# Altium PCB Smart-Switch-v1.0.PcbDoc (part 2 of 2)
Units mil, origin at the board's own origin, x right, y up, seen from the top; angles counter-clockwise.
Board outline 1456.69 x 1377.95 mil, 2 copper layers (Top Layer, Bottom Layer), stack 34 mil thick; 74 components, 43 nets, 234 pads, 74 vias.
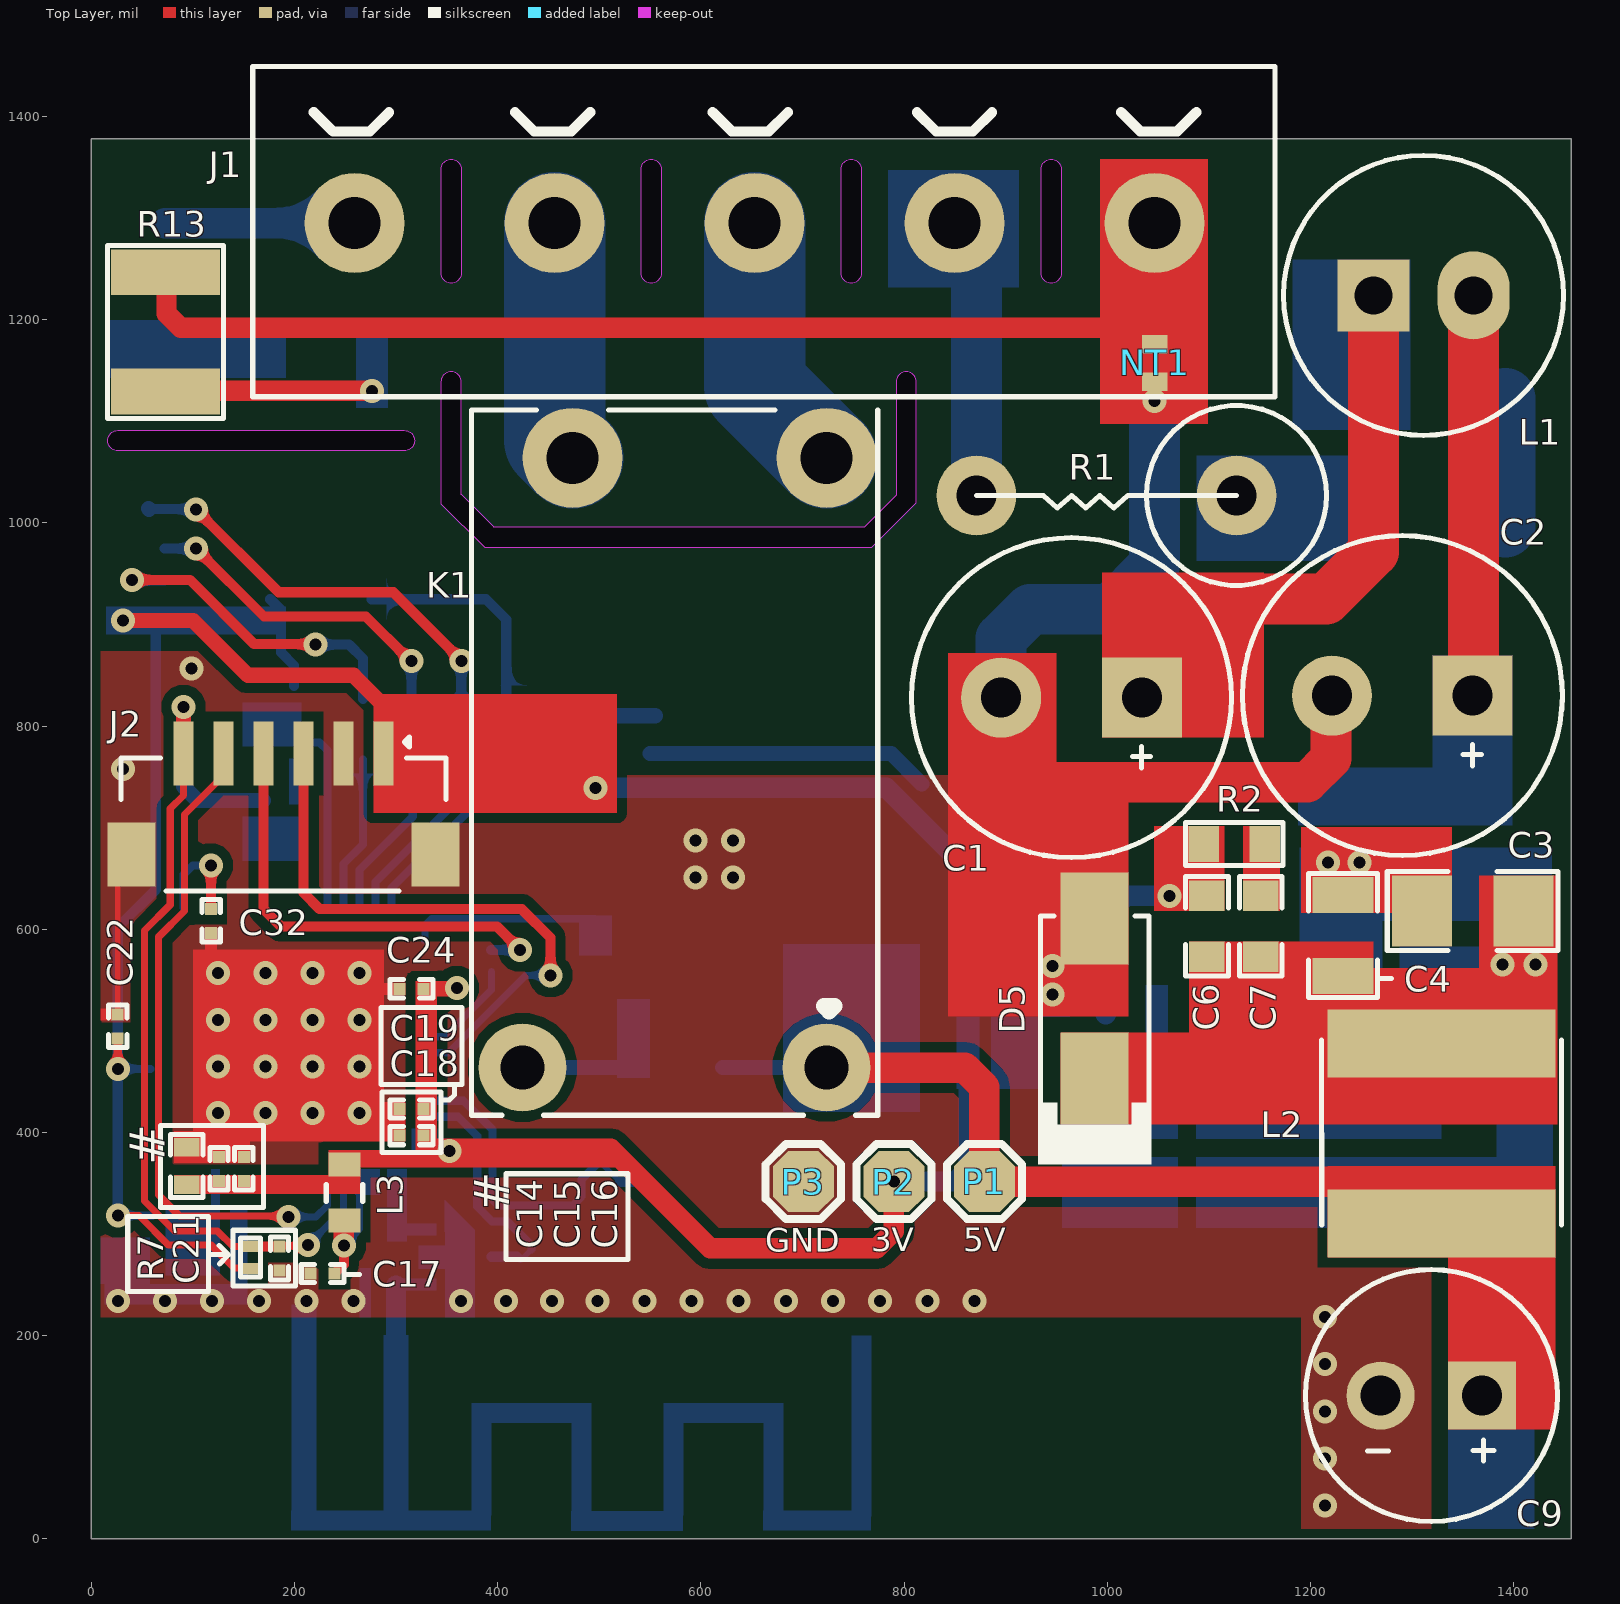
[diagram p0: Top Layer view]

## Part data (continued)
L2: library part YNR6045-221M, "590mA 220uH ±20% SMD,6x6mm Power Inductors ROHS", LCSC Part Number=C497842, Manufacturer=YJYCOIN, Package=SMD,6x6mm, ComponentLink1Description=LCSC, ComponentLink1URL=https://www.lcsc.com/product-detail/Power-Inductors_YJYCOIN-YNR6045-221M_C497842.html, Item Type=Inductor, Manufacturer Part Number=YNR6045-221M
L3: library part SDCL1608C2N0STDF, "2nH ±0.3nH 0603 Inductors", LCSC Part Number=C370234, Manufacturer=Sunlord, ComponentLink1Description=LCSC, ComponentLink1URL=https://lcsc.com/product-detail/Inductors-SMD_Sunlord-SDCL1608C2N0STDF_C370234.html, Manufacturer Part Number=SDCL1608C2N0STDF
L4: library part FHW0603UC1N6KST, "700mA 1.6nH ±10% 40mΩ 0603 Inductors (SMD) ROHS", LCSC Part Number=C317978, Manufacturer=FH, ComponentLink1Description=LCSC, ComponentLink1URL=https://www.lcsc.com/product-detail/Inductors-SMD_FH-Guangdong-Fenghua-Advanced-Tech-FHW0603UC1N6KST_C317978.html, Manufacturer Part Number=FHW0603UC1N6KST
LED1: "Colorless transparence Side stickers -40℃~+85℃ Common anode RGB 120° 60mW SMD,1.5x3.2mm Light Emitting Diodes (LED) ROHS", LCSC Part Number=C496820, Manufacturer=MEIHUA, Package=SMD,1.5x3.2mm, ComponentLink1Description=LCSC, ComponentLink1URL=https://www.lcsc.com/product-detail/Light-Emitting-Diodes-LED_MEIHUA-MHS110FRGBCT_C496820.html, Item Type="RGB LED", Manufacturer Part Number=MHS110FRGBCT
NT1: "Net Tie SMD", Manufacturer Part Number="Net Tie", Item Type="Net Tie Pad"
P1 P2 P3: "Test Point ON", Item Type="TEST POINT"
Q1: "MOSFET N-CH 130V 1A SOT23", LCSC Part Number=C156273, Manufacturer="Diodes Incorporated", Package=SOT-23-3L, ComponentLink1Description=LCSC, ComponentLink1URL=https://www.lcsc.com/product-detail/MOSFETs_Diodes-Incorporated-DMN13H750S-7_C156273.html, Item Type=Mosfet, Manufacturer Part Number=DMN13H750S-7
R1: library part "Vertical Resistor", "Metal Oxide Resistors 10Ω 2W ±350ppm/℃ ±5% Plugin Through Hole Resistors ROHS", LCSC Part Number=C601001, Manufacturer=VO, Manufacturer Part Number=MO2WS-10Ω±5%-6T63, Package=Plugin, ComponentLink1Description=LCSC, ComponentLink1URL=https://www.lcsc.com/product-detail/Through-Hole-Resistors_VO-MO2WS-10-5-6T63_C601001.html, Item Type="Through Hole Resistor"
R2: library part CRGCQ0603F220K, "RES 220K OHM 1% 1/10W 0603", LCSC Part Number=C4282892, Manufacturer="TE Connectivity", Power Rating=100mW, Supplier Part Number=73AC9080, Voltage Rating=75V, Category="Chip SMD Resistors", ComponentLink1Description=http://datasheet.octopart.com/CRGCQ0603F220K-TE-Connectivity-datasheet-114679081.pdf?src-supplier=Newark, ComponentLink1URL=http://datasheet.octopart.com/CRGCQ0603F220K-TE-Connectivity-datasheet-114679081.pdf?src-supplier=Newark, ComponentLink2Description=http://datasheet.octopart.com/CRGCQ0603F220K-TE-Connectivity-datasheet-114679081.pdf?src-supplier=Verical, ComponentLink2URL=http://datasheet.octopart.com/CRGCQ0603F220K-TE-Connectivity-datasheet-114679081.pdf?src-supplier=Verical, ComponentLink3Description=http://datasheet.octopart.com/CRGCQ0603F220K-TE-Connectivity-datasheet-114679081.pdf?src-supplier=Digi-Key, ComponentLink3URL=http://datasheet.octopart.com/CRGCQ0603F220K-TE-Connectivity-datasheet-114679081.pdf?src-supplier=Digi-Key, ComponentLink4Description=https://www.te.com/commerce/DocumentDelivery/DDEController?Action=srchrtrv&amp;DocNm=1773204-3&amp;DocType=DS&amp;DocLang=English&src-supplier=Digi-Key, ComponentLink4URL=https://www.te.com/commerce/DocumentDelivery/DDEController?Action=srchrtrv&amp;DocNm=1773204-3&amp;DocType=DS&amp;DocLang=English&src-supplier=Digi-Key, ComponentLink5Description=http://datasheet.octopart.com/CRGCQ0603F220K-TE-Connectivity-datasheet-114679081.pdf?src-supplier=Avnet, ComponentLink5URL=http://datasheet.octopart.com/CRGCQ0603F220K-TE-Connectivity-datasheet-114679081.pdf?src-supplier=Avnet, ComponentLink6Description=https://4donline.ihs.com/images/VipMasterIC/IC/TYEL/TYEL-S-A0004929575/TYEL-S-A0004929575-1.pdf?hkey=52A5661711E402568146F3353EA87419&src-supplier=Farnell, ComponentLink6URL=https://4donline.ihs.com/images/VipMasterIC/IC/TYEL/TYEL-S-A0004929575/TYEL-S-A0004929575-1.pdf?hkey=52A5661711E402568146F3353EA87419&src-supplier=Farnell, ComponentLink7Description=http://datasheet.octopart.com/CRGCQ0603F220K-TE-Connectivity-datasheet-114679081.pdf?src-supplier=Mouser, ComponentLink7URL=http://datasheet.octopart.com/CRGCQ0603F220K-TE-Connectivity-datasheet-114679081.pdf?src-supplier=Mouser, ComponentLink8Description=https://4donline.ihs.com/images/VipMasterIC/IC/TYEL/TYEL-S-A0004929575/TYEL-S-A0004929575-1.pdf?hkey=52A5661711E402568146F3353EA87419&src-supplier=Newark, ComponentLink8URL=https://4donline.ihs.com/images/VipMasterIC/IC/TYEL/TYEL-S-A0004929575/TYEL-S-A0004929575-1.pdf?hkey=52A5661711E402568146F3353EA87419&src-supplier=Newark, ComponentLink9Description=https://datasheet.octopart.com/5-2176339-3-TE-Connectivity-datasheet-167977702.pdf?src-supplier=Future+Electronics, ComponentLink9URL=https://datasheet.octopart.com/5-2176339-3-TE-Connectivity-datasheet-167977702.pdf?src-supplier=Future+Electronics, ComponentLink10Description=http://datasheet.octopart.com/CRGCQ0603F220K-TE-Connectivity-datasheet-114679081.pdf?src-supplier=Onlinecomponents.com, ComponentLink10URL=http://datasheet.octopart.com/CRGCQ0603F220K-TE-Connectivity-datasheet-114679081.pdf?src-supplier=Onlinecomponents.com, ComponentLink11Description=https://datasheet.octopart.com/CRGCQ0603F220K-TE-Connectivity-datasheet-114679081.pdf?src-supplier=Master+Electronics, ComponentLink11URL=https://datasheet.octopart.com/CRGCQ0603F220K-TE-Connectivity-datasheet-114679081.pdf?src-supplier=Master+Electronics, ComponentLink12Description=http://datasheet.octopart.com/CRGCQ0603F220K-TE-Connectivity-datasheet-114679081.pdf?src-supplier=TME, ComponentLink12URL=http://datasheet.octopart.com/CRGCQ0603F220K-TE-Connectivity-datasheet-114679081.pdf?src-supplier=TME, ComponentLink13Description=http://datasheet.octopart.com/CRGCQ0603F220K-TE-Connectivity-datasheet-114679081.pdf?src-supplier=Sager+Electronics, ComponentLink13URL=http://datasheet.octopart.com/CRGCQ0603F220K-TE-Connectivity-datasheet-114679081.pdf?src-supplier=Sager+Electronics, ComponentLink14Description=http://datasheet.octopart.com/CRGCQ0603F220K-TE-Connectivity-datasheet-114679081.pdf?src-supplier=Heilind+Electronics, ComponentLink14URL=http://datasheet.octopart.com/CRGCQ0603F220K-TE-Connectivity-datasheet-114679081.pdf?src-supplier=Heilind+Electronics, ComponentLink15Description=http://datasheet.octopart.com/CRGCQ0603F220K-TE-Connectivity-datasheet-114679081.pdf?src-supplier=Electro+Sonic, ComponentLink15URL=http://datasheet.octopart.com/CRGCQ0603F220K-TE-Connectivity-datasheet-114679081.pdf?src-supplier=Electro+Sonic, ComponentLink16Description=http://datasheet.octopart.com/CRGCQ0603F220K-TE-Connectivity-datasheet-114679081.pdf?src-supplier=Interstate+Connecting+Components, ComponentLink16URL=http://datasheet.octopart.com/CRGCQ0603F220K-TE-Connectivity-datasheet-114679081.pdf?src-supplier=Interstate+Connecting+Components, Height=550um, Item Type=Resistor, Manufacturer Part Number=CRGCQ0603F220K, Pricing="1=0.006 (USD)", RoHS=Yes, Stock=4740, Supplier=Avnet, Voltage Rating (DC)=75V
R3 R4: library part CRCW120622K0FKEAC, "RES 22K OHM 1% 1/4W 1206", LCSC Part Number=C1511874, Manufacturer=Vishay, Supplier Part Number=71-CRCW120622K0FKEAC, Category="Chip SMD Resistors", Item Type=Resistor, Manufacturer Part Number=CRCW120622K0FKEAC, Pricing="1=0.1, 10=0.036, 50=0.036, 100=0.016, 1000=0.011, 10000=0.007 (USD)", RoHS=Yes, RoHS Compliant=Yes, Stock=118020, Supplier=Mouser
R5: library part AC0603FR-0756KL, "RES SMD 56K OHM 1% 1/10W 0603", LCSC Part Number=C144647, Manufacturer=Yageo, Supplier Part Number=4073924, Category="Chip SMD Resistors", ComponentLink1Description=http://www.mouser.com/ds/2/447/yageodocoutput-1111992.pdf?src-supplier=Mouser, ComponentLink1URL=http://www.mouser.com/ds/2/447/yageodocoutput-1111992.pdf?src-supplier=Mouser, ComponentLink2Description=http://www.yageo.com/NewPortal/yageodocoutput?fileName=/pdf/R-Chip/PYu-AC_51_RoHS_L_6.pdf&src-supplier=Digi-Key, ComponentLink2URL=http://www.yageo.com/NewPortal/yageodocoutput?fileName=/pdf/R-Chip/PYu-AC_51_RoHS_L_6.pdf&src-supplier=Digi-Key, ComponentLink3Description=https://datasheet.octopart.com/AC0603FR-0756KL-Yageo-datasheet-151884373.pdf?src-supplier=Future+Electronics, ComponentLink3URL=https://datasheet.octopart.com/AC0603FR-0756KL-Yageo-datasheet-151884373.pdf?src-supplier=Future+Electronics, Item Type=Resistor, Manufacturer Part Number=AC0603FR-0756KL, Pricing="5000=0.0016, 25000=0.0015, 150000=0.0014, 500000=0.0014, 1500000=0.0013 (USD)", RoHS=Yes, Stock=100000, Supplier="Future Electronics"
R6: library part CRCW08055K60FKEA, "RES SMD 5.6K OHM 1% 1/8W 0805", Case Code (Imperial)=0805, Case Code (Metric)=2012, LCSC Part Number=C844634, Manufacturer=Vishay, Max Operating Temperature=155°C, Max Power Dissipation=125mW, Min Operating Temperature=-55°C, Package Quantity=5000, Ratings=AEC-Q200, Resistance Tolerance=1%, Resistor Type="Thick Film", Supplier Part Number=6791572P, Temperature Coefficient=100ppm/°C, Voltage Rating=150V, Case/Package=0805, Category="Chip SMD Resistors", ComponentLink1Description=https://datasheet.ciiva.com/11811/0900766b80d98b26-11811062.pdf?src-supplier=Rs, ComponentLink1URL=https://datasheet.ciiva.com/11811/0900766b80d98b26-11811062.pdf?src-supplier=Rs, ComponentLink2Description=https://datasheet.ciiva.com/2525/dcrcwe3-2525722.pdf?src-supplier=Digi-Key, ComponentLink2URL=https://datasheet.ciiva.com/2525/dcrcwe3-2525722.pdf?src-supplier=Digi-Key, ComponentLink3Description=https://datasheet.ciiva.com/16767/70201119-16767127.pdf?src-supplier=Allied+Electronics, ComponentLink3URL=https://datasheet.ciiva.com/16767/70201119-16767127.pdf?src-supplier=Allied+Electronics, ComponentLink4Description=https://datasheet.ciiva.com/7841/1697337-7841861.pdf?src-supplier=Element14, ComponentLink4URL=https://datasheet.ciiva.com/7841/1697337-7841861.pdf?src-supplier=Element14, ComponentLink5Description=https://datasheet.ciiva.com/26317/fld-crcw-e3-data-en-26317147.pdf?src-supplier=Distrelec, ComponentLink5URL=https://datasheet.ciiva.com/26317/fld-crcw-e3-data-en-26317147.pdf?src-supplier=Distrelec, ComponentLink6Description=https://datasheet.ciiva.com/7841/1697337-7841690.pdf?src-supplier=Element14, ComponentLink6URL=https://datasheet.ciiva.com/7841/1697337-7841690.pdf?src-supplier=Element14, ComponentLink7Description=https://datasheet.ciiva.com/22683/1847332-22683327.pdf?src-supplier=Element14, ComponentLink7URL=https://datasheet.ciiva.com/22683/1847332-22683327.pdf?src-supplier=Element14, ComponentLink8Description=https://datasheet.ciiva.com/2525/dcrcwe3-2525723.pdf?src-supplier=Digi-Key, ComponentLink8URL=https://datasheet.ciiva.com/2525/dcrcwe3-2525723.pdf?src-supplier=Digi-Key, ComponentLink9Description=https://datasheet.ciiva.com/2525/dcrcwe3-2525724.pdf?src-supplier=Digi-Key, ComponentLink9URL=https://datasheet.ciiva.com/2525/dcrcwe3-2525724.pdf?src-supplier=Digi-Key, ComponentLink10Description=https://datasheet.ciiva.com/9065/dcrcwe3-9065422.pdf?src-supplier=Avnet, ComponentLink10URL=https://datasheet.ciiva.com/9065/dcrcwe3-9065422.pdf?src-supplier=Avnet, Contact Plating=Tin, Depth=1.25mm, Features="Automotive AEC-Q200", Height=0.45mm, Item Type=Resistor, Length=2mm, Manufacturer Part Number=CRCW08055K60FKEA, Number of Terminations=2, Packaging="Tape and Reel", Pins=2, Power Rating=125mW, Pricing="1250=0.024, 2500=0.013, 4000=0.015, 5000=0.011 (GBP)", Reach SVHC Compliant=Unknown, RoHS=Yes, RoHS Compliant=Yes, Series=CRCW, Stock=100250, Supplier=Rs, Technology="THICK FILM", Termination=SMD/SMT, Tolerance=1%, Voltage Rating (DC)=150V, Weight=0.000194oz, Width=1.25mm
R7 R10 R14 R15: library part RC0201FR-0710KL, "RES SMD 10K OHM 1% 1/20W 0201", LCSC Part Number=C106225, Manufacturer=Yageo, Package=0201, ComponentLink7Description=LCSC, ComponentLink7URL=https://www.lcsc.com/product-detail/Chip-Resistor-Surface-Mount_YAGEO-RC0201FR-0710KL_C106225.html, Item Type=Resistor, Manufacturer Part Number=RC0201FR-0710KL
R8: library part RC0201FR-07499RL, "RES 499 OHM 1% 1/20W 0201", Case Code (Imperial)=0201, Case Code (Metric)=0603, LCSC Part Number=C138137, Manufacturer=Yageo, Max Operating Temperature=125°C, Max Power Dissipation=50mW, Min Operating Temperature=-55°C, Resistor Type="Thick Film", Temperature Coefficient=200ppm/°C, Tolerance=1%, Case/Package=0201, Category="Chip SMD Resistors", ComponentLink1Description=http://www.yageo.com/documents/recent/PYu-RC_Group_51_RoHS_L_10.pdf?src-supplier=Digi-Key, ComponentLink1URL=http://www.yageo.com/documents/recent/PYu-RC_Group_51_RoHS_L_10.pdf?src-supplier=Digi-Key, ComponentLink2Description=http://www.yageo.com/documents/recent/PYu-RC_Group_51_RoHS_L_9.pdf?src-supplier=Digi-Key, ComponentLink2URL=http://www.yageo.com/documents/recent/PYu-RC_Group_51_RoHS_L_9.pdf?src-supplier=Digi-Key, Depth=0.3mm, Features="Moisture Resistant", Height=0.01inch, Item Type=Resistor, Lead Free="Lead Free", Length=0.024inch, Manufacturer Part Number=RC0201FR-07499RL, Military Standard=Not, Number of Terminations=2, Packaging="Tape and Reel", Pricing 1="10000=0.00128 (USD)", Resistance=499R, RoHS=Yes, RoHS Compliant=Yes, Stock 1=150000, Supplier 1=Avnet, Supplier Part Number 1=RC0201FR-07499RL, Width=0.012inch
R9: library part RC0402FR-071KL, "RES 1K OHM 1% 1/16W 0402", Case Code (Imperial)=0402, Case Code (Metric)=1005, LCSC Part Number=C106235, Manufacturer=Yageo, Max Operating Temperature=155°C, Max Power Dissipation=63mW, Min Operating Temperature=-55°C, Power Rating=62.5mW, Resistance=1kR, Resistance Tolerance=1%, Resistor Type="Thick Film", Temperature Coefficient=100ppm/°C, Voltage Rating=50V, Case/Package=0402, Category="Chip SMD Resistors", ComponentLink1Description=https://datasheet.ciiva.com/11819/0900766b80c66297-11819477.pdf?src-supplier=RSComponents, ComponentLink1URL=https://datasheet.ciiva.com/11819/0900766b80c66297-11819477.pdf?src-supplier=RSComponents, ComponentLink2Description=https://datasheet.ciiva.com/7983/1018594-7983502.pdf?src-supplier=Element14, ComponentLink2URL=https://datasheet.ciiva.com/7983/1018594-7983502.pdf?src-supplier=Element14, ComponentLink3Description=https://datasheet.ciiva.com/22747/1018594-22747513.pdf?src-supplier=Element14, ComponentLink3URL=https://datasheet.ciiva.com/22747/1018594-22747513.pdf?src-supplier=Element14, ComponentLink4Description=https://datasheet.ciiva.com/12666/pyu-rc0402-51-rohs-l-6-r-12666741.pdf?src-supplier=Mouser, ComponentLink4URL=https://datasheet.ciiva.com/12666/pyu-rc0402-51-rohs-l-6-r-12666741.pdf?src-supplier=Mouser, ComponentLink5Description=https://datasheet.ciiva.com/7849/1018594-7849869.pdf?src-supplier=Element14, ComponentLink5URL=https://datasheet.ciiva.com/7849/1018594-7849869.pdf?src-supplier=Element14, ComponentLink6Description=https://datasheet.ciiva.com/7849/1018594-7849871.pdf?src-supplier=Element14, ComponentLink6URL=https://datasheet.ciiva.com/7849/1018594-7849871.pdf?src-supplier=Element14, ComponentLink7Description=https://datasheet.ciiva.com/17063/pyu-rc0402-51-rohs-l-6-r-17063193.pdf?src-supplier=Future+Electronics, ComponentLink7URL=https://datasheet.ciiva.com/17063/pyu-rc0402-51-rohs-l-6-r-17063193.pdf?src-supplier=Future+Electronics, Construction=Rectangular, Depth=0.5mm, Features="Moisture Resistant", Height=0.32mm, Item Type=Resistor, Lead Free="Lead Free", Length=1mm, Manufacturer Part Number=RC0402FR-071KL, Military Standard=Not, Number of Pins=2, Number of Terminations=2, Packaging="Tape and Reel", Pricing 1="10000=0.00085, 20000=0.00087, 40000=0.00084, 60000=0.00083, 80000=0.00079, 100000=0.00078, 1000000=0.00076 (USD)", Reach SVHC Compliant=Yes, RoHS=Yes, RoHS Compliant=Yes, Series=RC, Size Code=0402, Stock 1=13030000, Supplier 1=Avnet, Supplier Part Number 1=RC0402FR-071KL, Technology="THICK FILM", Termination=SMD/SMT, Tolerance=1%, Voltage Rating (DC)=50V, Width=0.5mm
R11: library part B57332V5103F360, "THERMISTOR NTC 10KOHM 3380K 0603", Case Code (Imperial)=0603, Case Code (Metric)=1608, LCSC Part Number=C209893, Manufacturer="TDK EPCOS", Max Operating Temperature=150°C, Max Power Dissipation=180mW, Min Operating Temperature=-40°C, Package Quantity=4000, Resistance Tolerance=1%, Supplier Part Number=8807288P, Case/Package=0603, Category=Thermistors, ComponentLink1Description=https://datasheet.ciiva.com/26930/getdatasheetpartid-777571-26930642.pdf?src-supplier=Verical, ComponentLink1URL=https://datasheet.ciiva.com/26930/getdatasheetpartid-777571-26930642.pdf?src-supplier=Verical, ComponentLink2Description=https://datasheet.ciiva.com/46435/1835850-46435735.pdf?src-supplier=Element14, ComponentLink2URL=https://datasheet.ciiva.com/46435/1835850-46435735.pdf?src-supplier=Element14, Contact Plating=Tin, Depth=0.8mm, Height=0.9mm, Item Type="NTC Thermistor", Length=1.6mm, Manufacturer Part Number=B57332V5103F360, Mounting Technology="Surface Mount", Packaging="Tape and Reel", Pins=2, Power Rating=180mW, Pricing="250=0.085 (GBP)", Radiation Hardening=No, Reach SVHC Compliant=No, RoHS=Yes, RoHS Compliant=Yes, Series=B573, Stock=178550, Supplier=Rs, Termination=SMD/SMT, Tolerance=1%, Width=0.8mm
R12 R13: library part CR1210J30204G, "750mW Thick Film Resistors ±5% ±200ppm/℃ 200kΩ 1210 Chip Resistor - Surface Mount ROHS", LCSC Part Number=C102430, Manufacturer="LIZ Elec", Package=1210, ComponentLink1Description=LCSC, ComponentLink1URL=https://www.lcsc.com/product-detail/Chip-Resistor-Surface-Mount_LIZ-Elec-CR1210J30204G_C102430.html, Item Type=Resistor, Manufacturer Part Number=CR1210J30204G
R16: library part RT0603BRD07240RL, "RES SMD 240 OHM 0.1% 1/10W 0603", Case Code (Imperial)=0603, Case Code (Metric)=1608, LCSC Part Number=C705750, Manufacturer=Yageo, Max Operating Temperature=125°C, Max Power Dissipation=100mW, Min Operating Temperature=-55°C, Resistor Type="Thin Film", Temperature Coefficient=25ppm/°C, Tolerance=0.1%, Voltage Rating=75V, Voltage Rating (DC)=50V, Case/Package=0603, Category="Chip SMD Resistors", ComponentLink1Description=https://datasheet.ciiva.com/8886/pyu-rt-1-to-0-05-rohs-l-4-8886602.pdf?src-supplier=Avnet, ComponentLink1URL=https://datasheet.ciiva.com/8886/pyu-rt-1-to-0-05-rohs-l-4-8886602.pdf?src-supplier=Avnet, ComponentLink2Description=https://datasheet.ciiva.com/12799/pyu-rt-1-to-0-05-rohs-l-4-12799039.pdf?src-supplier=Mouser, ComponentLink2URL=https://datasheet.ciiva.com/12799/pyu-rt-1-to-0-05-rohs-l-4-12799039.pdf?src-supplier=Mouser, Construction=Rectangular, Contact Plating=Tin,Matte, Depth=0.8mm, Features="Moisture Resistant", Height=0.022inch, Lead Free="Lead Free", Length=1.6mm, Manufacturer Part Number=RT0603BRD07240RL, Military Standard=Not, Number of Terminations=2, Packaging="Tape and Reel", Power Rating=100mW, Pricing 1="1=0.13940 (USD)", Radiation Hardening=No, Resistance=240R, RoHS=Yes, RoHS Compliant=Yes, Series=RT, Stock 1=5, Supplier 1="Arrow Electronics", Supplier Part Number 1=RT0603BRD07240RL, Termination=SMD/SMT, Width=0.031inch
R17 R18: library part RCA0603100RFKEAHP, "RES SMD 100 OHM 1% 1/4W 0603", Case Code (Imperial)=0603, Case Code (Metric)=1608, LCSC Part Number=C2074203, Manufacturer="Vishay Dale", Max Operating Temperature=155°C, Max Power Dissipation=250mW, Min Operating Temperature=-55°C, Resistor Type="Thick Film", Supplier Part Number 1=541-3244-2-ND, Temperature Coefficient=100ppm/°C, Tolerance=1%, Case/Package=0603, ComponentLink1Description=http://www.vishay.com/docs/20067/rcahp.pdf?src-supplier=Digi-Key, ComponentLink1URL=http://www.vishay.com/docs/20067/rcahp.pdf?src-supplier=Digi-Key, Features="Automotive AEC-Q200,Anti-Sulfur", Manufacturer Part Number=RCA0603100RFKEAHP, Number of Terminations=2, Packaging="Tape and Reel", Resistance=100R, RoHS Compliant=Yes, Stock 1=0, Supplier 1=Digi-Key
SW1 SW2: "SWITCH TACTILE SPST-NO 0.05A 12V", Contact Current Rating=50mA, Contact Resistance=100mR, Insulation Resistance=100MR, LCSC Part Number=C231329, Manufacturer=Omron, Max Operating Temperature=70°C, Max Voltage Rating (DC)=12V, Min Operating Temperature=-25°C, Operating Force=1.5N, Package Quantity=1, Ratings="Dust Proof,IP40", Supplier Part Number 1=SW1020DKR-ND, Actuator Length=0.4mm, Actuator Type=Standard, ComponentLink1Description=http://www.farnell.com/datasheets/60838.pdf?src-supplier=Farnell, ComponentLink1URL=http://www.farnell.com/datasheets/60838.pdf?src-supplier=Farnell, ComponentLink2Description=http://www.farnell.com/datasheets/60838.pdf?src-supplier=Element14, ComponentLink2URL=http://www.farnell.com/datasheets/60838.pdf?src-supplier=Element14, ComponentLink3Description=https://omronfs.omron.com/en_US/ecb/products/pdf/en-b3u.pdf?src-supplier=Digi-Key, ComponentLink3URL=https://omronfs.omron.com/en_US/ecb/products/pdf/en-b3u.pdf?src-supplier=Digi-Key, ComponentLink4Description=http://www.omron.com/ecb/products/pdf/en-b3u.pdf?src-supplier=Digi-Key, ComponentLink4URL=http://www.omron.com/ecb/products/pdf/en-b3u.pdf?src-supplier=Digi-Key, ComponentLink5Description=https://www.distrelec.biz/Web/Downloads/he/et/B3U_eng_datasheet.pdf?mime=application%2Fpdf&src-supplier=Distrelec, ComponentLink5URL=https://www.distrelec.biz/Web/Downloads/he/et/B3U_eng_datasheet.pdf?mime=application%2Fpdf&src-supplier=Distrelec, ComponentLink6Description=http://www.onlinecomponents.com/productFiles/mf-OM/en-b3u.pdf?src-supplier=Onlinecomponents.com, ComponentLink6URL=http://www.onlinecomponents.com/productFiles/mf-OM/en-b3u.pdf?src-supplier=Onlinecomponents.com, ComponentLink7Description=https://www.verical.com/server-webapp/html/getDatasheet?partID=552554&src-supplier=Verical, ComponentLink7URL=https://www.verical.com/server-webapp/html/getDatasheet?partID=552554&src-supplier=Verical, ComponentLink8Description=http://www.farnell.com/datasheets/1685550.pdf?src-supplier=Element14, ComponentLink8URL=http://www.farnell.com/datasheets/1685550.pdf?src-supplier=Element14, ComponentLink9Description=http://www.farnell.com/datasheets/2610940.pdf?src-supplier=Farnell, ComponentLink9URL=http://www.farnell.com/datasheets/2610940.pdf?src-supplier=Farnell, ComponentLink10Description=https://www.alliedelec.com/m/d/4c8a9ef82804fc3c241a13c1e298fd73.pdf?src-supplier=Allied+Electronics, ComponentLink10URL=https://www.alliedelec.com/m/d/4c8a9ef82804fc3c241a13c1e298fd73.pdf?src-supplier=Allied+Electronics, Contact Material=Silver, Current Rating=50mA, Depth=2.5mm, Electrical Life=200000Cycles, Height=1.2mm, Illumination Type=Non-Illuminated,Illuminated, Item Type=Switch, Lead Free="Lead Free", Length=4mm, Manufacturer Part Number=B3U-1000P, Max Current Rating=50mA, Mechanical Life=200000Cycles, Mount="Surface Mount", Orientation=Straight, Packaging="Tape and Reel", Pricing 1="1=1, 10=0.961, 25=0.9064, 50=0.7976, 100=0.7251, 250=0.68888, 500=0.67074, 1000=0.52571 (USD)", REACH SVHC=Unknown, Stock 1=116454, Supplier 1=Digi-Key, Switch Function=Off-Mom, Switch Travel=0.15mm, Termination=SMD/SMT, Throw Configuration=SPST, Voltage Rating (DC)=12V, Weight=0.000776oz, Width=3mm
U1: "AC to DC Switching Converter Boost/Buck/Flyback 4.25V 145kHz T/R 16-Pin SO N", LCSC Part Number=C3094036, Manufacturer=STMicroelectronics, Supplier Part Number=497-VIPER319LDCT-ND, Category="Voltage Regulators - Switching", Item Type=IC, Manufacturer Part Number=VIPER319LDTR, Pricing="1=1.65, 10=1.471, 25=1.3964, 100=1.1471, 250=1.07228, 500=0.9476, 1000=0.74811 (USD)", RoHS=No, Supplier=Digi-Key
U2: "75dB@(120Hz) 1A Fixed 3.3V~3.3V Positive 15V SOT-89-3 Linear Voltage Regulators (LDO) ROHS", LCSC Part Number=C81768, Manufacturer=UTC, Package=SOT-89-3, ComponentLink1Description=LCSC, ComponentLink1URL=https://www.lcsc.com/product-detail/Linear-Voltage-Regulators-LDO_UTC-Unisonic-Tech-LD1117AG-33-AB3-A-R_C81768.html, Item Type=IC, Manufacturer Part Number=LD1117AG-33-AB3-A-R
U4: "21dBm ESP32-S3R8 2.4GHz SMD WiFi Modules ROHS", LCSC Part Number=C3013940, Manufacturer="Espressif Systems", Supplier Part Number=356-ESP32-S3FH4R2, ComponentLink1Description=LCSC, ComponentLink1URL=https://www.lcsc.com/product-detail/WiFi-Modules_Espressif-Systems-ESP32-S3FH4R2_C3013940.html, Item Type=IC, Manufacturer Part Number=ESP32-S3FH4R2, Pricing="1=2.32, 10=2.32, 50=2.32, 100=2.32, 1000=2.32, 10000=2.32 (USD)", RoHS=No, Stock=2650, Supplier=Mouser
U5: "Optocoupler, Transistor, 3.75Kv, Sop-4 Rohs Compliant: Yes", Case/Package=SOP, Collector Emitter Saturation Voltage=300mV, Collector Emitter Voltage (VCEO)=40V, Current Transfer Ratio=300%, Forward Current=50mA, Forward Voltage=1.4V, Isolation Voltage=3.75kV, LCSC Part Number=C367377, Manufacturer=Renesas, Max Collector Current=80mA, Max Operating Temperature=100°C, Max Power Dissipation=150mW, Min Operating Temperature=-55°C, Supplier Part Number 1=559-1030-1-ND, Category=Optocouplers, ComponentLink1Description=https://datasheet.ciiva.com/15119/getdatasheetpartid-627104-15119353.pdf?src-supplier=Verical, ComponentLink1URL=https://datasheet.ciiva.com/15119/getdatasheetpartid-627104-15119353.pdf?src-supplier=Verical, Input Type=AC, Item Type=Optocoupler, Lead Free="Lead Free", Manufacturer Part Number=PS2705-1-F3-A, Max Input Current=50mA, Mount="Surface Mount", Number of Channels=1, Number of Circuits=1, Number of Elements=1, Number of Pins=4, Output Voltage=40V, Packaging="Tape and Reel", Power Dissipation=150mW, Pricing 1="1=0.99000, 10=0.64600, 100=0.42290, 1000=0.35070 (USD)", Radiation Hardening=No, Rise Time=3us, RoHS=Yes, RoHS Compliant=Yes, Stock 1=58368, Supplier 1=Digi-Key
X1: library part X322540MPB4SI, "40MHz SMD Crystal Resonator 15pF SMD3225-4P Crystals ROHS", LCSC Part Number=C9010, Manufacturer="Yangxing Tech", ComponentLink1Description=LCSC, ComponentLink1URL=https://www.lcsc.com/product-detail/Crystals_Yangxing-Tech-X322540MPB4SI_C9010.html, Item Type=Crystal, Manufacturer Part Number=X322540MPB4SI

## Via types
v1: diameter 23.62, hole 11.81, Top Layer to Bottom Layer, 74 vias

## Nets (pads, with @x,y where several pads share a name; then routed paths per layer and width w, separated by ;. In a path a pad name is that pad's centre, name@x,y a point inside that pad or via, vN(x,y) a via of type N, cw(c..) or ccw(c..) an arc to the next point about the centre after c; other vN are vias at no path point)
3V3: C12.2 C13.2 C14.2 C15.2 C16.2 C18.2 C19.2 C22.2 C24.2 J2.1 L3.1 LED1.1 P2.1 R7.2 R10.1 R15.2 U2.2 U4.20 U4.46 U4.55 U4.56 U5.4 | length 2631.9
  Top Layer w5: v1@25.94,462.66 v1(26,462.6)
  Top Layer w7: v1(26,318.31) 26.07,318.24 46.84,318.24 75.94,289.14 117.94,289.14 140.51,266.57 R7.2@156.24,266.57
  Top Layer w8: v1@25.94,462.66 C22.2@25.94,492.74
  Top Layer w10: v1@358.89,541.48 v1(359.7,542.29)
  Top Layer w15: v1(31.07,903.88) 100.2,903.88 154.06,850.03 258.12,850.03 285.25,822.9 285.25,775.25 J2.1 J2.1@287.24,772.77 ; 285.34,723.71 285.34,724.79 ; C24.2 v1@358.89,541.48
  Top Layer w20: C18.2@329.63,397 329.63,461.35 ; 333.95,384 511.11,384 609.11,286 773,286 789.84,302.84 v1(789.84,351.74)
  Bottom Layer w8: v1@26,462.67 U4.20@58.09,462.67 ; v1@27.11,318.16 R10.1@60.02,318.16 ; U4.46 358.89,541.48 v1(359.7,542.29)
  Bottom Layer w10: v1(26,318.31) v1(26,462.6) 26,462.67 26,601.84 63.26,639.11 LED1.1@63.26,895.74 ; LED1.1 LED1.1@61.78,898.23 ; LED1.1@59.85,896.29 LED1.1@61.78,898.23 ; LED1.1@64.26,895.74 LED1.1@61.78,898.23 ; 116.06,903.88 67.44,903.88 LED1.1@61.78,898.23 ; U5.4 186.75,914.22 186.75,872.47 199.45,859.77 R15.2
  Bottom Layer w20: U4.56 v1@352.56,384 ; v1(496.23,739.23) 782.49,739.23 U2.2@862.95,658.77 ; v1(789.84,351.74) 850.07,351.74 863.28,364.96 863.28,465.28
  other v1: 352.56,382
5V: C9.1 C10.2 C11.2 D4.2 D6.2 K1.1 L2.2 P1.1 R6.2 U2.3 | length 838.3
  Top Layer w30: K1.1 859.49,464 879,444.49 P1.1 1247.33,351.74 ; L2.2@1231.8,334.17 1231.8,328.88 1250.26,310.42 L2.2
  Bottom Layer w5: D6.2@620.37,463.15 D6.2@621.22,464
  Bottom Layer w15: D6.2@621.22,464 K1.1
BUTTON_1: C27.2 R15.1 SW2.2 U4.38 | length 191
  Bottom Layer w8: C27.2 202.45,783.95 224.65,783.95 232.37,776.23 U4.38
C_GND: C3.1 C4.1 C6.1 C7.1 C8.1 D5.1 L2.1 R3.1 U1.1 U1.2 U1.4 U1.6
  other v1: 1389,565.15 1421.47,565.15
EN: C20.2 C21.2 J2.6 R7.1 SW1.2 U4.4 | length 921
  Top Layer w7: J2.6 90.64,731.87 77.57,718.79 77.57,624.25 52.23,598.92 52.23,332.65 81.74,303.14 123.92,303.14 139.24,287.83 R7.1 ; C21.2@185.9,288.54 212.4,288.54 v1(213.11,289.26)
  Top Layer w10: R7.1 C21.2
  Top Layer w15: J2.6 v1(90.64,819)
  Bottom Layer w7: v1(213.11,289.26) 248.12,324.26 U4.4
  Bottom Layer w15: v1(90.64,819) 90.64,740.58 104.32,726.91 SW1.2@169.49,726.91
FB: R3.2 R5.1 U1.7
GND: Ant1.GND C1.2 C2.2 C9.2 C10.1 C11.1 C12.1 C13.1 C14.1 C15.1 C16.1 C17.1 C18.1 C19.1 C20.1 C21.1 C22.1 C24.1 C25.1 C26.1 C27.1 C28.1 C29.1 C31.2 C32.1 D5.2 J2.2 J2.MP1 J2.MP2 NT1.2 P3.1 Q1.2 R6.1 R9.1 R11.1 R14.2 SW1.1 SW2.1 U2.1 U4.57 X1.2 X1.4 | length 1449
  Top Layer w5: C22.1 25.91,660.06 J2.MP2 ; C32.1 117.8,572.93 119.73,571 ; v1(263.92,419) v1@271.75,411.17 ; 277.65,541.48 C24.1
  Top Layer w40: C1.2 896.1,827.32 896.1,768.15 919.53,744.72 1196.71,744.72 1220.14,768.15 1220.14,829.14 C2.2
  Bottom Layer w5: v1(946,536) 930.92,536 922,544.92 U2.1 922,555.08 930.92,564 v1(946,564)
  Bottom Layer w8: U4.57@107.4,571.96 U4.57@118.77,571.96
  Bottom Layer w15: R9.1@549.89,773.14 R9.1 787.22,773.14 817.22,743.15
  Bottom Layer w50: C1.2 895.42,886.42 924,915 1003,915 1046.48,958.48 v1(1046.5,1119.8)
  other v1: 1214,32.81 1214,79.2 1214,125.6 1214,172 1214,218.4 26,234 72.4,234 118.8,234 165.19,234 211.59,234 257.99,234 363.76,234 408.16,234 453.56,234 497.96,234 544.35,234 590.75,234 637.15,234 683.55,234 729.95,234 776.35,234 822.74,234 869.14,234 124.73,419 171.12,419 217.52,419 124.73,465 171.12,465 217.52,465 263.92,465 124.73,511 171.12,511 217.52,511 263.92,511 124.73,557 171.12,557 217.52,557 263.92,557 594.63,650.95 631.63,650.95 594.66,687.33 631.66,687.33 31.07,758 98.3,856.9
I: J1.3 K1.4 | length 260.5
  Bottom Layer w100: J1.3 652.78,1134.83 K1.4
IO0: J2.5 U4.5 | length 663.9
  Top Layer w7: J2.5 130.01,751.36 123.67,745.02 123.59,745.02 91.57,712.99 91.57,618.08 66.23,592.75 66.23,338.45 87,317.69 193.54,317.69 v1(194.18,317.04)
  Bottom Layer w7: v1(194.18,317.04) 221.1,317.04 232.37,328.32 U4.5
IO4_: Q1.1 R14.1 U4.43 | length 186
  Bottom Layer w7: U4.43 327.84,588.9 328.5,589.56 328.5,604.11 334.76,610.38 R14.1 496.23,610.38
IO6_: C31.1 R9.2 U4.42 U5.3 | length 663.5
  Bottom Layer w8: U4.42 295.36,640.84 387.87,733.35 453.39,733.35 462,741.96 C31.1@462,783.87
  Bottom Layer w10: U5.3 388.41,924.97 408.38,905 408.38,820.34 436.85,791.87 462,791.87 C31.1@468.27,798.14
  Bottom Layer w15: C31.1 464.27,810.14 R9.2
LED_B: R18.2 U4.39 | length 153.7
  Bottom Layer w8: U4.39 248.12,664.5 267.25,683.64 R18.2
LED_G: R17.2 U4.40 | length 167.6
  Bottom Layer w8: U4.40 263.87,658.61 316.35,711.09 R17.2
LED_R: R16.2 U4.41 | length 181.5
  Bottom Layer w8: U4.41 279.62,646.55 365.7,732.63 R16.2
LIVE: J1.2 R1.2 | length 227.8
  Bottom Layer w50: J1.2 J1.2@858.9,1285.92 ; R1.2 871.09,1241.69
NetAnt1_ANT#: Ant1.ANT# C28.2 L4.1 | length 58.4
  Bottom Layer w20: Ant1.ANT# L4.1
NetC1_1: C1.1 D2.1 L1.1 | length 573.1
  Top Layer w50: C1.1 1048.37,842.37 1048.37,899.21 1074.16,925 1215.28,925 1262,971.72 L1.1
NetC2_1: C2.1 L1.2 U1.13 U1.14 U1.15 U1.16 | length 394.3
  Top Layer w8: C2.1 C2.1@1360.43,830.84
  Top Layer w50: C2.1@1360.43,830.84 L1.2
NetC6_2: C6.2 R2.1 U1.8 | length 204.5
  Top Layer w20: v1(1061,633) C6.2
  Bottom Layer w20: U1.8 998.43,612.77 1018.66,633 v1(1061,633)
NetC7_2: C7.2 R2.2
NetC8_2: C8.2 D3.1 D4.1 R4.2
NetC17_2: C17.2 L3.2 U4.2 U4.3 | length 125.3
  Top Layer w5: L3.2@248.51,312.84 L3.2
  Top Layer w10: C17.2 248.51,270.39 v1(248.51,288.86)
  Top Layer w20: v1(248.51,288.86) L3.2@248.51,312.84
  Bottom Layer w7: v1(248.51,288.86) 248.51,289.71 263.87,305.06 U4.3
NetC29_2: C29.2 L4.2 U4.1
NetC32_2: C32.2 U4.29 | length 106.4
  Top Layer w10: C32.2 v1(117.8,663)
  Bottom Layer w8: U4.29 90.64,653.9 99.74,663 v1(117.8,663)
NetD1_1: D1.1 D2.2 | length 130.5
  Bottom Layer w50: D2.2@1389,1125 cw(c1389,1122.42) D2.2@1391.58,1122.42
  Bottom Layer w60: D1.1 D2.2@1391.58,1122.42
NetD1_2: D1.2 R1.1
NetD6_1: D6.1 K1.2 Q1.3 | length 117.6
  Bottom Layer w5: D6.1@533.63,463.15 D6.1@541.63,463.15
  Bottom Layer w15: K1.2 532.78,464 D6.1@533.63,463.15
NetLED1_2: LED1.2 R18.1 | length 330
  Top Layer w10: v1(40,944) 97,944 160.29,880.71 220.28,880.71 v1(220.79,880.2)
  Bottom Layer w10: v1@40.75,943.25 LED1.2 ; v1(220.79,880.2) 253.66,880.2 267.25,866.62 R18.1
NetLED1_3: LED1.3 R17.1 | length 321.8
  Top Layer w10: v1(102.99,974.75) 169.87,907.87 270.17,907.87 v1@311.36,866.67
  Bottom Layer w5: R17.1@315.09,828.27 R17.1
  Bottom Layer w10: LED1.3 v1(102.99,974.75) ; R17.1@315.09,828.27 v1(315.09,864)
NetLED1_4: LED1.4 R16.1 | length 408.2
  Top Layer w10: v1(103,1013) 184.26,931.74 297.07,931.74 364.09,864.71 v1(364.09,864)
  Bottom Layer w10: LED1.4@56.69,1013.56 v1@102.44,1013.56 ; R16.1@364.09,828.63 v1(364.09,864)
  Bottom Layer w15: LED1.4 LED1.4@56.69,1013.56 ; v1@102.44,1013.56 v1(103,1013) ; R16.1@364.09,828.63 R16.1
NetR4_1: R4.1 R5.2
NetR8_1: R8.1 U4.49 | length 103
  Bottom Layer w7: U4.49 347.44,494.24 393.77,540.57 R8.1@393.77,558.48
NetR12_2: R12.2 U5.1
NetR13_2: R13.2 U5.2 | length 174
  Top Layer w20: R13.2@102,1130 v1(276,1130)
NEUTRAL: J1.1 NT1.1 R13.1 | length 1078.4
  Top Layer w5: J1.1@1029.23,1252.03 1036.68,1259.48 1046.48,1259.48 J1.1
  Top Layer w20: R13.1 73.96,1245.7 73.96,1205.94 87.89,1192 1039.5,1192 1046.5,1185
NTC_TEMP: R10.2 R11.2 U4.12 | length 0.4
  Bottom Layer w5: 87.83,318 88.14,317.69
O: J1.4 K1.3 | length 238.5
  Bottom Layer w100: J1.4 455.93,1081.68 K1.3
RXD: J2.3 U4.50 | length 591
  Top Layer w10: J2.3 208.75,635.98 224.84,619.89 423.64,619.89 451.83,591.71 v1(451.83,554.73)
  Bottom Layer w7: U4.50 351.49,478.49 427.73,554.73 v1(451.83,554.73)
SWITCH: J1.5 R12.1 | length 187.3
  Bottom Layer w5: R12.1 R12.1@72.53,1295.19
  Bottom Layer w30: R12.1@72.53,1295.19 J1.5
TXD: J2.4 R8.2 | length 450.8
  Top Layer w10: J2.4@169.49,772.91 169.49,619.68 186.27,602.89 398.93,602.89 v1(422,579.83)
  Bottom Layer w10: R8.2@393.45,579.83 v1(422,579.83)
VCC: C3.2 C4.2 D3.2 U1.3
  other v1: 1217,666 1248,666
XTAL_IN: C25.2 U4.54 X1.1 | length 248
  Bottom Layer w5: X1.1@418.69,277.75 422.37,274.06 X1.1
  Bottom Layer w8: U4.54 360.95,415.5 379.76,396.69 379.76,327.21 394.47,312.5 409.63,312.5 433.25,288.88 X1.1
  Bottom Layer w10: C25.2 X1.1@418.69,277.75
XTAL_OUT: C26.2 U4.53 X1.3 | length 337.3
  Bottom Layer w5: X1.3 X1.3@520.47,351.27
  Bottom Layer w8: U4.53 366.42,431.24 394.76,402.9 394.76,333.98 400.48,328.25 473.73,328.25 482.54,337.05 482.54,353.91 X1.3
  Bottom Layer w10: X1.3@520.47,351.27 C26.2
pads on no net: U1.5 U1.9 U1.10 U1.11 U1.12 U4.6 U4.7 U4.8 U4.9 U4.10 U4.11 U4.13 U4.14 U4.15 U4.16 U4.17 U4.18 U4.19 U4.21 U4.22 U4.23 U4.24 U4.25 U4.26 U4.27 U4.28 U4.30 U4.31 U4.32 U4.33 U4.34 U4.35 U4.36 U4.37 U4.44 U4.45 U4.47 U4.48 U4.51 U4.52

## Polygon pours and split planes (outlines as drawn)
GND on Bottom Layer "GND_L02_P000" (solid, remove dead copper, pour order 0): 919,296.99 1319,296.99 1319,10 1190.86,10 1190.86,218 935.86,218 919,218 8.97,218 8.97,873.93 233,873.93 233,788.96 270.32,751.64 919,751.64
GND on Top Layer "GND_L01_P001" (solid, remove dead copper, pour order 1): 386.7,873.93 386.7,751.64 933.42,751.64 933.42,351.74 1319,351.74 1319,10 1190.86,10 1190.86,218 8.97,218 8.97,873.93

## Other copper
Top Layer:
  rectangle net 3V3: 277.65,714.49 517.31,831.45
  rectangle net GND: 277.65,535.58 309.14,547.39
  rectangle net GND: 271.75,391.09 309.14,430.07
  rectangle net 3V3: 233.37,365.8 519.81,383.06
  rectangle net 3V3: 318.89,375.31 340.38,549.16
  rectangle net GND: 111.9,571 123.71,602.5
  rectangle net 3V3: 81.23,339.66 264.87,358.41
  rectangle net 3V3: 233.37,339.66 264.87,380.38
  rectangle net GND: 843.26,514.08 950,871.81
  rectangle net GND: 901,514.08 1020.9,744.72
  rectangle net C_GND: 1232,492.44 1411.92,562.11
  rectangle net C_GND: 953.97,407.96 1443,498.51
  rectangle net C_GND: 1080.5,413.46 1441.21,521.05
  rectangle net C_GND: 1147.21,487.43 1262,588
  rectangle net C_GND: 1365.74,413.46 1443,653
  rectangle net VCC: 1190.49,616.28 1338.96,700.48
  rectangle net NetC7_2: 1133.5,618 1170,701.5
  rectangle net NEUTRAL: 992.68,1167 1099.18,1358
  rectangle net GND: 992.68,1097.54 1099.18,1151.54
  rectangle net NetC1_1: 994.63,788.63 1154,951
  rectangle net 5V: 1335.44,107.58 1441.21,343.88
  rectangle net 5V: 1216.8,276.95 1441.21,366.91
  rectangle net NetC6_2: 1045.72,618 1115.5,701.5
  rectangle net C_GND: 1080.5,413.46 1168.5,588
  rectangle net GND: 81.23,370.22 155.92,401.66
  rectangle net GND: 100,391 288,580
  rectangle net GND: 8.94,510.49 33.37,522.3
Bottom Layer:
  rectangle net LIVE: 783.94,1231.73 913,1347.41
  rectangle net GND: 194.54,722.91 206.35,768.24
  rectangle net EN: 148.79,667.14 206.35,711.09
  rectangle net BUTTON_1: 148.79,779.84 206.73,823.11
  rectangle net NetR13_2: 260.25,1113.21 291.75,1199.57
  rectangle net NetC8_2: 1383.22,336.08 1438.39,529.84
  rectangle net C_GND: 1187.43,446.51 1209.43,544.97
  rectangle net FB: 955.1,393.47 1069.43,463.47
  rectangle net C_GND: 1087.43,393.47 1329.08,468.47
  rectangle net C_GND: 1087.43,393.47 1109.43,544.97
  rectangle net FB: 1037.43,428.47 1059.43,544.97
  rectangle net NetD6_1: 517.49,453.91 549.77,531.52
  rectangle net NetC2_1: 1320.21,701.97 1398.95,869.37
  rectangle net NetC1_1: 1182.31,1091.54 1298.51,1259.43
  rectangle net NetD1_2: 1087.63,962.54 1166.37,1066.37
  rectangle net NetD1_2: 1087.63,962.54 1283.31,1066.37
  rectangle net GND: 9.03,250.69 57.71,296.5
  rectangle net GND: 13,230.63 153.63,250.69
  rectangle net NTC_TEMP: 82.51,279 93.14,325.28
  rectangle net NetR12_2: 18.46,1142.49 191.75,1199.78
  rectangle net 3V3: 14.15,890.1 191.75,917.66
  rectangle net NTC_TEMP: 73,259.5 126.47,325.28
  rectangle net NTC_TEMP: 117.8,296.5 126.47,364.32
  rectangle net GND: 136.48,247.37 153.63,323.81
  rectangle net NetC29_2: 299.76,298.65 339.65,310.47
  rectangle net GND: 264.02,218 275.28,266.86
  rectangle net NetC29_2: 291.03,329.86 299.69,364.32
  rectangle net NetC29_2: 291.03,292.75 310.59,364.32
  rectangle net NetAnt1_ANT#: 299.76,244.35 339.65,256.16
  rectangle net GND: 196.76,191 221.57,230.63
  rectangle net NetC17_2: 259.54,338.72 283.95,351.52
  rectangle net NetC17_2: 259.54,338.72 283.95,364.32
  rectangle net 3V3: 315.05,373.84 340.64,404.08
  rectangle net GND: 321.99,265.85 354.65,289.06
  rectangle net GND: 347.98,218 377.51,304.56
  rectangle net VCC: 1189.31,608.15 1437.81,680.53
  rectangle net NetC2_1: 1187.43,701.97 1359.43,759.52
  rectangle net IO4_: 480.09,574.03 512.37,613.71
  rectangle net 3V3: 851.53,443.09 874.36,516.2
  rectangle net 3V3: 859.28,443.09 871.09,496.5
  rectangle net 5V: 1335.44,10 1420.47,290.71
  rectangle net NetC8_2: 1087.43,306 1438.39,376
  rectangle net NetR4_1: 955.1,306 1069.43,376
  rectangle net 5V: 680.78,420 815.78,585.68
  rectangle net GND: 885.51,443.05 934.87,567.21
  rectangle net GND: 910.58,513.95 963,582.06
  rectangle net C_GND: 1287.43,438.47 1329.08,583
  rectangle net VCC: 1226.87,487.43 1271,569.47
  rectangle net C_GND: 1287.43,487.43 1359.43,583
  rectangle net C_GND: 1288.35,544.97 1438.57,583
  rectangle net VCC: 1189.31,558 1271,654
  region net GND: 377.51,302.41 377.51,304.56 348.51,333.55 347.98,333.55 347.98,302.41

## Silkscreen, mask and mechanical layers (free items; w line width, h text height)
Top Overlay:
  lines w5: 116.34,279.97 134.61,279.97 ; 125.64,288.94 134.61,279.97 ; 126,270.57 134.61,279.18 134.61,279.97 ; 248.52,260.48 263.92,260.48 ; 343.92,432.17 352.56,432.17 357.19,436.8 357.19,447.32 ; 1266,551.41 1279.83,551.41 ; 35.82,243.72 115.43,243.72 115.43,317.23 35.82,317.23 35.82,243.72 ; 68,326.11 169.24,326.11 169.24,407 68,407 68,326.11 ; 139.55,248.91 200.82,248.91 200.82,303.85 139.55,303.85 139.55,248.91 ; 284.88,447.45 364.93,447.45 364.93,523 284.88,523 284.88,447.45 ; 286,380.26 343.92,380.26 343.92,440.03 286,440.03 286,380.26 ; 407.87,275 528.02,275 528.02,359.47 407.87,359.47 407.87,275
  text "#" at 26,408.19 h60 r270
  text "#" at 365,361.19 h60 r270
  text "GND" at 663,274.91 h40
  text "3V" at 767.52,275.25 h40
  text "5V" at 857.91,275.4 h40
Bottom Overlay:
  drawing of 44 lines, arcs and shapes, not listed
  text "GPIO" at 148.19,879.71 h30
  text "RESET" at 11.02,570.62 h30 r270
  text "$" at 721.59,389.11 h40 r270
  text "$" at 370.54,327.55 h40 r270
Bottom Solder:
  lines w25: 871,1278 871.09,1027
  lines w60: 455.93,1081.68 455.93,1295.19
  lines w70: 652.78,1295.19 652.78,1134.83 723.61,1064
Dimensions:
  drawing of 191 lines, arcs and shapes, not listed
  text "Layer" at -164.42,2790 h60
  text "Name" at 245.49,2790 h60
  text "Material" at 1175.23,2790 h60
  text "Thickness" at 2035,2790 h60
  text "Constant" at 2684.84,2790 h60
  text "Board Layer Stack" at 3254.7,2790 h60
  text "Top Overlay" at 245.49,2670 h60
  text "Top Solder" at 245.49,2550 h60
  text "Solder Resist" at 1175.23,2550 h60
  text "0.076mm" at 2035,2550 h60
  text "3.5" at 2684.84,2550 h60
  text "1" at -164.42,2430 h60
  text "Top Layer" at 245.49,2430 h60
  text "0.229mm" at 2035,2430 h60
  text "Dielectric 1" at 245.49,2310 h60
  text "FR-4" at 1175.23,2310 h60
  text "0.406mm" at 2035,2310 h60
  text "4.8" at 2684.84,2310 h60
  text "2" at -164.42,2190 h60
  text "Bottom Layer" at 245.49,2190 h60
  text "0.229mm" at 2035,2190 h60
  text "Bottom Solder" at 245.49,2070 h60
  text "Solder Resist" at 1175.23,2070 h60
  text "0.076mm" at 2035,2070 h60
  text "3.5" at 2684.84,2070 h60
  text "Bottom Overlay" at 245.49,1950 h60
  text "Total board thickness:" at -164.42,1830 h60
  text "1.016mm" at 2035,1830 h60
Board Outline:
  lines w5: 364.09,1027.63 364.09,1138.9 ccw(c354.09,1138.9) 354.09,1148.9 ccw(c354.09,1138.9) 344.09,1138.9 344.09,1018.83 386.92,976 518,976 768.24,976 812.04,1019.8 812.04,1138.9 ccw(c802.04,1138.9) 802.04,1148.9 ccw(c802.04,1138.9) 792.04,1138.9 792.04,1027.33 760.71,996 518,996 395.83,996 ; 364.5,1027.63 395.83,996.3 ; 0,0 1456.69,0 1456.69,1377.95 0,1377.95 0,0 ; 16,1081 ccw(c26,1081) 26,1071 30.14,1071 308.02,1071 ccw(c308.02,1081) 318.02,1081 ccw(c308.02,1081) 308.02,1091 30.14,1091 26,1091 ccw(c26,1081) 16,1081 ; 344.15,1245.98 ccw(c354.15,1245.98) 354.15,1235.98 ccw(c354.15,1245.98) 364.15,1245.98 364.15,1343.86 364.15,1348 ccw(c354.15,1348) 354.15,1358 ccw(c354.15,1348) 344.15,1348 344.15,1343.86 344.15,1245.98 ; 541,1245.98 ccw(c551,1245.98) 551,1235.98 ccw(c551,1245.98) 561,1245.98 561,1343.86 561,1348 ccw(c551,1348) 551,1358 ccw(c551,1348) 541,1348 541,1343.86 541,1245.98 ; 737.85,1245.98 ccw(c747.85,1245.98) 747.85,1235.98 ccw(c747.85,1245.98) 757.85,1245.98 757.85,1343.86 757.85,1348 ccw(c747.85,1348) 747.85,1358 ccw(c747.85,1348) 737.85,1348 737.85,1343.86 737.85,1245.98 ; 934.7,1245.98 ccw(c944.7,1245.98) 944.7,1235.98 ccw(c944.7,1245.98) 954.7,1245.98 954.7,1343.86 954.7,1348 ccw(c944.7,1348) 944.7,1358 ccw(c944.7,1348) 934.7,1348 934.7,1343.86 934.7,1245.98
Drill Drawing:
  circle w10: c-148.38,3340.83 r33.33
  lines w10: -181.71,3157.5 -148.38,3174.17 -115.04,3157.5 -131.71,3190.83 -115.04,3224.17 -148.38,3207.5 -181.71,3224.17 -165.04,3190.83 -181.71,3157.5 ; -181.71,3457.5 -115.04,3457.5 -115.04,3524.17 -181.71,3524.17 -181.71,3457.5 ; -181.71,3674.17 -115.04,3674.17 -148.38,3607.5 -181.71,3674.17 ; -181.71,3774.17 -165.04,3774.17 -148.38,3757.5 -131.71,3774.17 -115.04,3774.17 -131.71,3790.83 -115.04,3807.5 -131.71,3807.5 -148.38,3824.17 -165.04,3807.5 -181.71,3807.5 -165.04,3790.83 -181.71,3774.17
  lines w15: -241.5,3112.5 6718.62,3112.5 ; -241.5,3862.5 6718.62,3862.5 ; 309.38,2962.5 309.38,4012.5 ; 849.24,2962.5 849.24,4012.5 ; 1948.92,2962.5 1948.92,4012.5 ; 2454.79,2962.5 2454.79,4012.5 ; 3188.59,2962.5 3188.59,4012.5 ; 4688.14,2962.5 4688.14,4012.5 ; 5277.99,2962.5 5277.99,4012.5 ; 6023.79,2962.5 6023.79,4012.5 ; -241.5,2962.5 6718.62,2962.5 6718.62,4012.5 -241.5,4012.5 -241.5,2962.5
  text "Symbol" at -151.5,3907.5 h72
  text "Count" at 354.38,3907.5 h72
  text "Hole Size" at 894.24,3907.5 h72
  text "Plated" at 1993.92,3907.5 h72
  text "Hole Type" at 2499.79,3907.5 h72
  text "Drill Layer Pair" at 3233.59,3907.5 h72
  text "Via/Pad" at 4733.14,3907.5 h72
  text "Pad Shape" at 5322.99,3907.5 h72
  text "Template" at 6068.79,3907.5 h72
  text "2" at 354.38,3757.5 h60
  text "37.40mil (0.950mm)" at 894.24,3757.5 h60
  text "PTH" at 1993.92,3757.5 h60
  text "Round" at 2499.79,3757.5 h60
  text "Top Layer - Bottom Layer" at 3233.59,3757.5 h60
  text "Pad" at 4733.14,3757.5 h60
  text "(Mixed)" at 5322.99,3757.5 h60
  text "(Mixed)" at 6068.79,3757.5 h60
  text "2" at 354.38,3607.5 h60
  text "43.31mil (1.100mm)" at 894.24,3607.5 h60
  text "PTH" at 1993.92,3607.5 h60
  text "Round" at 2499.79,3607.5 h60
  text "Top Layer - Bottom Layer" at 3233.59,3607.5 h60
  text "Pad" at 4733.14,3607.5 h60
  text "Rounded" at 5322.99,3607.5 h60
  text "c220h110" at 6068.79,3607.5 h60
  text "7" at 354.38,3457.5 h60
  text "51.18mil (1.300mm)" at 894.24,3457.5 h60
  text "PTH" at 1993.92,3457.5 h60
  text "Round" at 2499.79,3457.5 h60
  text "Top Layer - Bottom Layer" at 3233.59,3457.5 h60
  text "Pad" at 4733.14,3457.5 h60
  text "Rounded" at 5322.99,3457.5 h60
  text "c250h130" at 6068.79,3457.5 h60
  text "8" at 354.38,3307.5 h60
  text "39.37mil (1.000mm)" at 894.24,3307.5 h60
  text "PTH" at 1993.92,3307.5 h60
  text "Round" at 2499.79,3307.5 h60
  text "Top Layer - Bottom Layer" at 3233.59,3307.5 h60
  text "Pad" at 4733.14,3307.5 h60
  text "(Mixed)" at 5322.99,3307.5 h60
  text "(Mixed)" at 6068.79,3307.5 h60
  text "74" at 354.38,3157.5 h60
  text "11.81mil (0.300mm)" at 894.24,3157.5 h60
  text "PTH" at 1993.92,3157.5 h60
  text "Round" at 2499.79,3157.5 h60
  text "Top Layer - Bottom Layer" at 3233.59,3157.5 h60
  text "Via" at 4733.14,3157.5 h60
  text "Rounded" at 5322.99,3157.5 h60
  text "v60h30" at 6068.79,3157.5 h60
  text "93 Total" at 354.38,3007.5 h60

## Dimensions
0,1377.95 to 1456.69,1377.95 on Dimensions
1456.69,0 to 1456.69,1377.95 on Dimensions